# Altium PCB PCI Express_16765X6890_64PIN_Low profile_Clear.PCBDOC (part 7 of 9)
Units mm, origin at the board's own origin, x right, y up, seen from the top; angles counter-clockwise.
Board outline 80.71 x 137.84 mm, 6 copper layers (Top Layer, Layer 2 (GND), Layer 3, Layer 4, Layer 5 (AGND), Bottom Layer), stack 1.571 mm thick; 507 components, 297 nets, 1544 pads, 616 vias.
Unrouted connection lines stored in the file: 101.
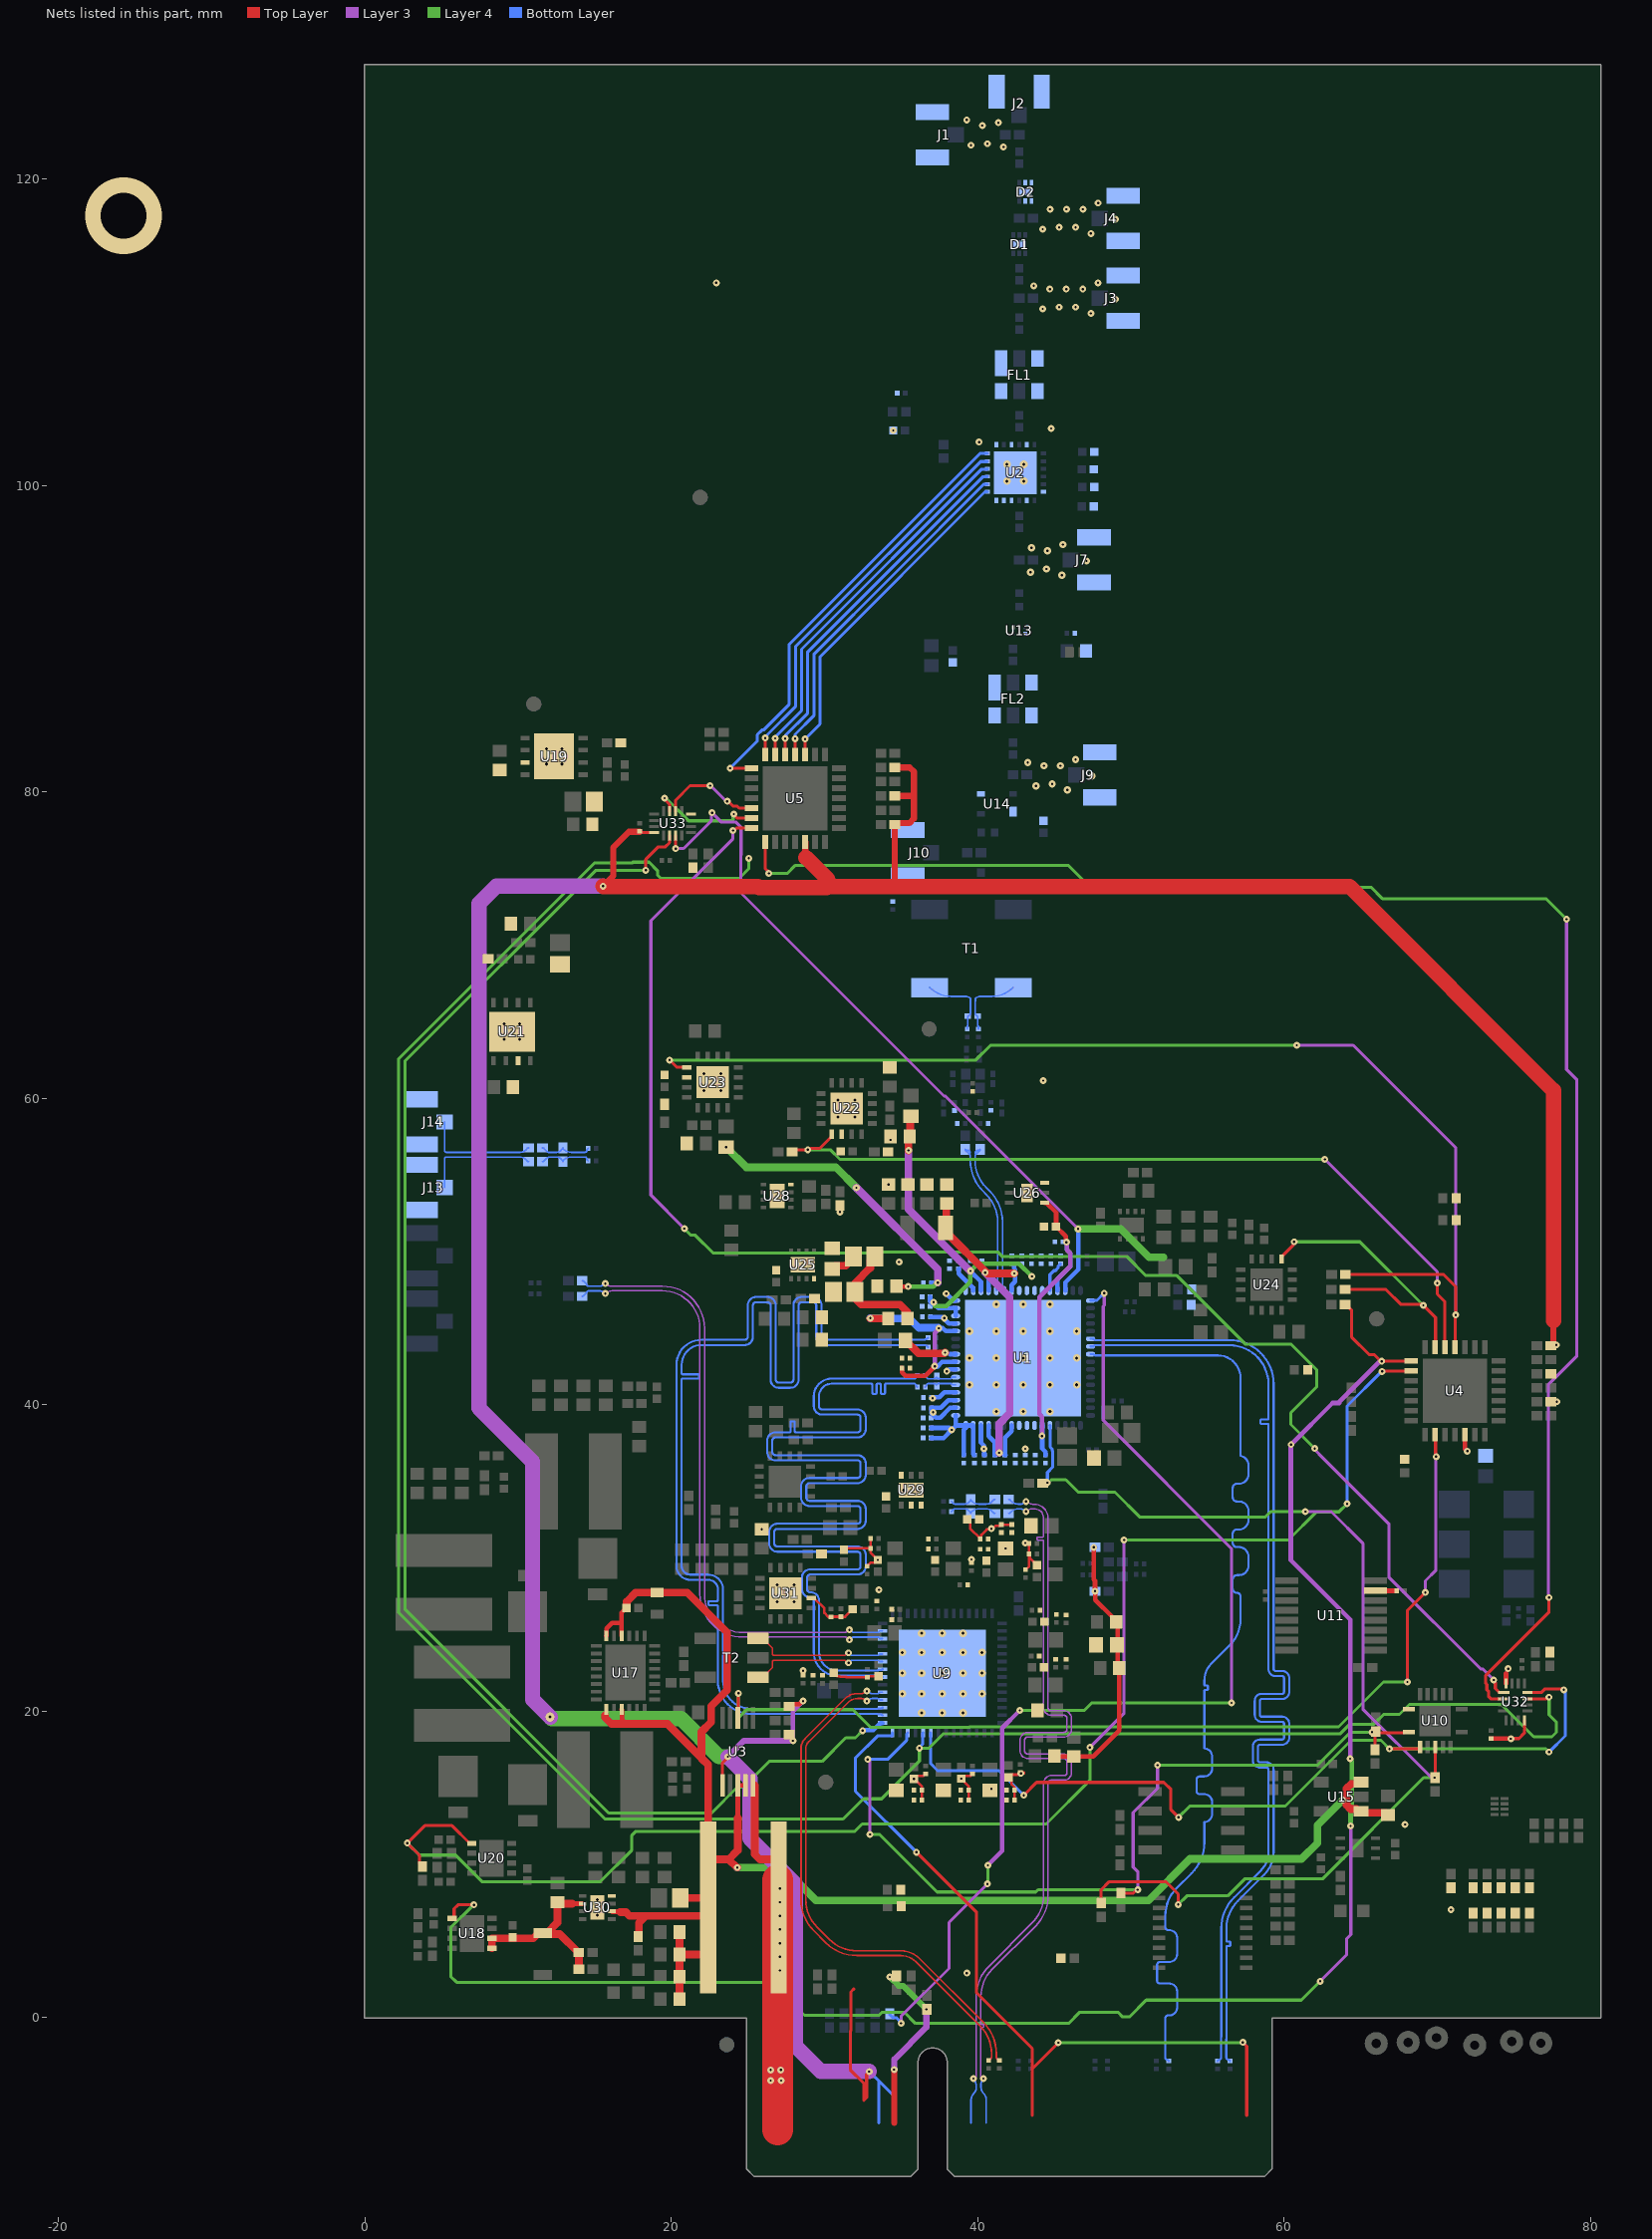
[diagram p5: the nets of this part, all layers, seen from the top]

## Via types
v1: diameter 0.45, hole 0.15, Top Layer to Bottom Layer, 469 vias
v2: diameter 0.5, hole 0.2, Top Layer to Bottom Layer, 128 vias
v3: diameter 0.475, hole 0.15, Top Layer to Bottom Layer, 15 vias
v4: diameter 5, hole 3, Top Layer to Bottom Layer, 3 vias
v5: diameter 0.6, hole 0.2, Top Layer to Bottom Layer, 1 vias

## Nets (pads, with @x,y where several pads share a name; then routed paths per layer and width w, separated by ;. In a path a pad name is that pad's centre, name@x,y a point inside that pad or via, vN(x,y) a via of type N, cw(c..) or ccw(c..) an arc to the next point about the centre after c; other vN are vias at no path point)
1.8V_SPI_ADC: C95.2 C136.2 C137.2 C244.1 R101.2 R135.2 U1.13 U1.38 U10.14 U11.15 U26.1 | length 23.9
  Top Layer w0.3: U26.1@44.369,53.169 44.494,53.169 45.119,52.543 45.119,51.618 45.768,50.97 45.768,50.625 v1(45.796,50.597) ; U11.15@65.968,27.863 65.983,27.848 67.355,27.848 C244.1@67.355,27.838
  Layer 3 w0.3: v1(44.196,37.948) 44.196,39.21 44.044,39.362 44.044,47.015 46.05,49.022 46.05,49.886 45.822,50.114 45.822,50.571 v1(45.796,50.597)
  Bottom Layer w0.3: U1.38@44.213,38.642 44.213,37.118 44.415,36.916 44.415,36.703 C137.2@44.425,36.703 ; U1.13@45.213,47.442 45.213,48.179 46.05,49.017 46.05,49.876 45.825,50.102 45.825,50.568 v1(45.796,50.597)
3.3V: C239.2 C241.2 R16.2 R17.1 R18.1 R28.1 R29.1 R31.1 R32.1 R34.1 R35.1 R111.1 R112.1 R113.2 R114.2 R115.2 R123.2 R124.2 R125.2 R127.2 R128.2 U3.6 U4.5 U5.5 U32.8 U32.16 U33.8 U33.16 | length 241.1
  Top Layer w0.2: C241.2@17.932,77.413 17.942,77.413 18.028,77.327 U33.8@18.884,77.327 ; U3.6@23.345,15.148 23.345,16.628 23.698,16.981 v1(23.698,17.018) ; U5.5@28.734,76.728 28.734,75.609 28.834,75.509 ; 31.928,1.872 31.728,1.672 31.728,-0.872 31.682,-0.918 31.682,-3.412 32.559,-4.289 32.559,-5.41 32.749,-5.22 32.749,-3.708 32.918,-3.539 v1(32.918,-3.531) ; v1(74.803,18.186) 74.82,18.203 75.328,18.203 75.682,18.558 U32.8@75.682,19.399
  Top Layer w0.3: R112.1@27.686,18.466 27.736,18.466 27.886,18.316 27.886,18.266 27.911,18.24 27.911,18.088 v1(27.94,18.059) ; R111.1@27.686,20.295 27.836,20.445 28.354,20.445 28.56,20.65 v1(28.6,20.65) ; v1@71.795,37.094 U4.5@71.795,38.044 ; C239.2@73.508,18.206 74.784,18.206 v1(74.803,18.186) ; U32.16@74.482,21.799 74.482,22.474
  Top Layer w0.4: v1(15.545,73.838) 16.205,74.498 16.205,76.352 17.236,77.383 C241.2@17.932,77.383 ; U5.5@28.734,76.728 28.749,76.713 28.749,75.738 28.784,75.703 ; 34.437,73.816 34.588,73.967 R123.2@34.588,77.851 34.688,77.951 35.533,77.951 35.839,78.257 35.839,79.731 ; R125.2@34.588,79.731 35.839,79.731 ; R124.2@34.588,81.585 35.56,81.585 35.839,81.305 35.839,79.731 ; R114.2@77.405,43.84 77.455,43.84 77.555,43.94 77.555,43.99 77.582,44.018 77.582,45.466
  Top Layer w1: v1(15.545,73.838) 15.567,73.816 25.649,73.816 25.714,73.751 30.154,73.751 30.219,73.816 ; 28.784,75.703 30.219,74.268 30.219,73.816 ; 77.582,45.466 77.582,60.505 64.271,73.816 34.437,73.816 30.219,73.816
  Layer 3 w0.3: v1(27.94,18.059) 27.94,19.99 v1(28.6,20.65)
  Layer 3 w0.4: v1(23.698,17.018) 24.74,18.059 v1(27.94,18.059)
  Layer 3 w1: v5(12.09,19.609) 10.947,20.752 10.947,36.271 7.443,39.776 7.443,72.696 8.585,73.838 v1(15.545,73.838) ; v1(23.698,17.018) 25.131,15.585 25.131,11.69 28.116,8.706 28.116,-1.877 29.769,-3.531 v1(32.918,-3.531)
  Layer 4 w1: v5@12.192,19.507 20.625,19.507 23.114,17.018 v1(23.698,17.018)
  Bottom Layer w0.2: v1(32.918,-3.531) 33.29,-3.902 33.322,-3.902 34.559,-5.138 34.559,-6.888 ; 33.559,-6.888 33.559,-4.171
  other v1: 70.891,7.036 67.894,12.598 74.625,22.758 71.958,36.957 77.8,40.183 77.775,43.891
3.3Vaux: R23.2 R24.2 | length 12
  Top Layer w0.2: v1(34.265,2.642) 34.627,2.642 R24.2@34.696,2.711
  Top Layer w0.4: v1(34.544,-3.404) 34.551,-3.411 34.551,-6.881 34.559,-6.888
  Layer 3 w0.4: v1(34.544,-3.404) 34.554,-3.394 34.554,-2.734 36.652,-0.635 v1(36.652,0.533)
  Layer 4 w0.4: v1(34.265,2.642) 34.848,2.058 35.127,2.058 v1(36.652,0.533)
5V: C59.2 C148.2 L9.2 R83.2 R133.2 U18.1 U18.2 U30.6 | length 12.3
  Top Layer w0.3: 13.53,7.425 U30.6@14.214,7.425
  Top Layer w0.5: U18.1@8.301,4.504 U18.2@8.301,5.154 8.306,5.159 9.473,5.159 9.478,5.165 10.994,5.165 11.344,5.515 L9.2@11.619,5.515 ; 13.53,7.425 12.666,7.425 C148.2@12.573,7.518 12.573,6.194 11.894,5.515 L9.2@11.619,5.515 ; R133.2@13.977,3.15 13.968,3.159 13.968,4.232 R83.2@13.958,4.242 13.908,4.242 12.71,5.44 11.694,5.44 L9.2@11.619,5.515
12V: C33.2 C40.1 C41.1 C42.1 C43.1 C49.2 C149.2 L4.1 R15.2 R100.2 U3.8 U3.9 U15.1 U15.3 U17.9 U17.11 U17.26 U17.28 U30.2 | length 117.5
  Top Layer w0.3: U17.28@15.76,24.905 15.785,24.93 15.785,25.4 16.131,25.747 16.76,25.747 ; U30.2@16.114,6.925 16.139,6.9 16.651,6.9 16.673,6.878 ; U17.11@16.76,20.105 16.785,20.08 16.785,19.446 17.072,19.159 ; U17.26@16.76,24.905 16.76,25.747 ; C49.2@17.072,26.72 17.067,26.72 16.76,26.413 16.76,25.747 ; R15.2@22.708,8.28 R15.2@22.708,10.312 ; 24.345,13.014 U3.8@24.345,15.148 U3.9@24.845,15.148
  Top Layer w0.5: 15.685,19.71 15.685,19.569 16.095,19.159 17.072,19.159 19.756,19.159 21.971,16.944 ; 16.673,6.878 16.681,6.87 17.037,6.87 17.278,6.629 18.339,6.629 ; C49.2@17.072,26.72 17.077,26.72 17.097,26.74 17.097,27.147 17.675,27.725 L4.1@19.067,27.725 21.043,27.725 23.647,25.121 23.647,21.361 22.608,20.321 22.608,19.277 21.971,18.64 21.971,16.944 ; R100.2@17.831,5.276 17.881,5.326 17.881,6.171 18.339,6.629 ; C40.1@20.539,1.201 C41.1@20.539,2.658 C42.1@20.539,4.111 ; C43.1@20.539,5.573 C42.1@20.539,4.111 ; C149.2@20.588,7.798 22.131,7.798 R15.2@22.406,8.073 ; 22.406,16.509 21.971,16.944 ; R15.2@22.708,10.312 23.751,10.312 ; v1(24.308,9.779) 24.285,9.779 23.751,10.312 ; 24.345,13.014 24.345,10.906 23.751,10.312 ; U15.3@65.024,15.354 64.924,15.254 64.387,15.254 64.074,14.94 64.074,13.867 64.337,13.604 64.724,13.604 64.874,13.454 U15.1@65.024,13.454 65.124,13.354 66.641,13.354 C33.2@66.777,13.218 ; 18.339,6.629 22.131,6.629 R15.2@22.406,6.904 ; C42.1@20.539,4.111 22.131,4.111 22.406,4.386 R15.2@22.406,6.904 ; 21.971,16.944 21.971,16.916 22.406,16.482 R15.2@22.406,8.073 ; R15.2@22.406,6.904 R15.2@22.406,7.182 R15.2@22.406,8.073
  Layer 4 w0.5: v1(24.308,9.779) 27.305,9.779 29.447,7.637 51.147,7.637 53.859,10.349 61.138,10.349 62.174,11.385 62.174,12.543 v1(63.83,14.199)
04610_CS: R25.1 R144.1 R146.2 U9.12 U10.1 | length 56.1
  Top Layer w0.2: R144.1@49.341,8.119 50.165,8.119 50.377,8.331 v1(50.444,8.331) ; R146.2@65.938,17.475 65.938,18.6 R25.1@65.989,18.651 66.064,18.576 67.828,18.576 67.882,18.629 U10.1@68.142,18.629
  Layer 3 w0.2: v1(32.817,16.84) 32.969,16.688 v1(32.969,11.938) ; v1(50.444,8.331) 50.444,9.519 50.148,9.816 50.148,13.369 51.74,14.961 v1(51.74,16.459)
  Layer 4 w0.2: v1(32.969,11.938) 33.604,11.938 37.355,8.187 43.794,8.187 43.938,8.331 v1(50.444,8.331) ; v1(51.74,16.459) 62.179,16.459 64.338,18.618 v1(65.735,18.618) v1@65.689,18.572
  Bottom Layer w0.2: v1(32.817,16.84) 34.115,16.84 35.357,18.082 35.357,18.492 U9.12@35.437,18.572
4610_FINE_V: C150.2 C151.2 C154.2 C155.2 C166.2 C167.2 C169.2 C195.2 C196.2 C207.2 C208.2 FB15.1 FB16.1 FB19.1 FB23.1 FB26.1 U29.5 U29.6
  other v1: 40.894,14.91 41.823,30.603
04610_RESET: U9.15 U33.10 | length 98.9
  Top Layer w0.2: v1(18.339,74.879) 18.339,75.594 19.151,76.406 19.612,76.406 19.884,76.678 U33.10@19.884,77.127
  Layer 4 w0.2: v1(18.339,74.879) 18.313,74.854 15.056,74.854 2.61,62.407 2.61,26.651 15.913,13.348 22.631,13.348 24.314,15.03 24.708,15.03 26.391,16.713 29.851,16.713 31.392,18.254 32.021,18.254 v1(32.487,18.72)
  Bottom Layer w0.3: v1(32.487,18.72) 32.512,18.745 33.19,18.745 33.667,19.222 U9.15@33.787,19.222
04610_RESET_3.3: U5.27 U33.3 | length 7.8
  Top Layer w0.2: v1(19.558,79.578) 19.558,79.511 19.884,79.184 U33.3@19.884,78.727 ; v1(24.079,78.537) 24.079,78.492 24.294,78.278 U5.27@25.234,78.278
  Layer 4 w0.2: v1(19.558,79.578) 19.659,79.578 21.137,78.1 23.962,78.1 24.031,78.169 24.031,78.489 v1(24.079,78.537)
04610_STATUS0: U9.9 U10.2 U32.12 | length 56.8
  Top Layer w0.2: v1(43.002,14.503) 43.843,15.344 52.151,15.344 52.607,14.888 52.607,13.56 v1(53.111,13.056) ; v1(66.878,17.526) 68.827,17.526 68.867,17.566 U10.2@68.867,17.654 ; U32.12@75.932,21.199 76.777,21.199 77.006,21.429 78.215,21.429 v1(78.257,21.387)
  Layer 4 w0.2: v1(53.111,13.056) 53.848,13.792 60.078,13.792 64.37,18.085 66.319,18.085 v1(66.878,17.526) 77.089,17.526 v1(77.292,17.323)
  Bottom Layer w0.2: U9.9@36.937,18.572 36.937,16.556 37.381,16.112 41.394,16.112 v1(43.002,14.503) ; v1(77.292,17.323) 78.351,18.381 78.351,21.294 v1(78.257,21.387)
04610_STATUS0_3.3: U5.28 U32.1 | length 103.3
  Top Layer w0.2: v1(24.028,77.47) 24.096,77.47 24.254,77.628 U5.28@25.234,77.628 ; v1(73.685,22.022) 73.685,21.954 73.787,21.853 73.787,21.47 74.057,21.199 U32.1@74.332,21.199
  Layer 3 w0.2: v1(20.853,51.486) 18.669,53.67 18.669,71.577 24.028,76.937 v1(24.028,77.47) ; v1(62.001,37.135) 62.001,37.067 62.281,36.788 62.281,36.779 66.836,32.224 66.836,28.739 72.825,22.75 72.957,22.75 v1(73.685,22.022)
  Layer 4 w0.2: v1(20.853,51.486) 21.285,51.054 21.565,51.054 22.725,49.894 33.102,49.894 33.177,49.969 41.3,49.969 41.596,49.674 49.722,49.674 50.975,48.421 53.001,48.421 57.489,43.934 60.466,43.934 62.128,42.271 62.128,41.154 60.435,39.46 60.435,38.701 v1(62.001,37.135)
04610_STATUS1: U9.10 U32.11 | length 156.6
  Top Layer w0.2: U32.11@75.882,20.799 77.12,20.799 77.225,20.904 v1(77.292,20.904)
  Layer 4 w0.2: v1(25.06,75.653) 25.06,74.971 24.435,74.346 19.325,74.346 19.101,74.57 19.101,74.86 18.556,75.404 17.498,75.404 17.439,75.345 14.982,75.345 2.21,62.573 2.21,26.416 15.678,12.948 31.216,12.948 32.537,14.268 33.725,14.268 36.195,16.739 v1(36.195,17.577) 36.824,17.577 37.769,18.522 63.676,18.522 64.298,19.143 65.86,19.143 66.5,19.784 67.53,19.784 68.176,20.429 74.186,20.429 76.293,18.322 77.478,18.322 77.766,18.61 77.766,19.28 77.301,19.746 77.301,20.896 v1(77.292,20.904)
  Bottom Layer w0.2: v1(36.195,17.577) 36.195,17.644 36.417,17.866 36.417,18.552 U9.10@36.437,18.572
04610_STATUS1_3.3: U5.1 U32.2 | length 110.5
  Top Layer w0.2: U5.1@26.134,76.728 26.134,74.975 26.365,74.744 v1(26.365,74.676) ; U32.2@74.282,20.799 73.485,20.799 73.355,20.93 73.355,21.266 73.231,21.39 73.231,21.733 73.16,21.804 73.16,22.329 77.292,26.461 v1(77.292,27.407)
  Layer 3 w0.2: v1(77.292,27.407) 77.25,27.449 77.25,41.315 77.557,41.622 77.563,41.622 79.113,43.172 79.113,61.19 78.435,61.867 v1(78.435,71.679)
  Layer 4 w0.2: v1(26.365,74.676) 27.581,74.676 28.106,75.201 45.905,75.201 47.338,73.768 65.672,73.768 66.415,73.025 77.089,73.025 v1(78.435,71.679)
04610_SYNC: U9.14 | length 50.6
  Top Layer w0.2: v1(36.002,10.779) 39.929,6.852 39.929,1.6 43.559,-2.03 43.559,-3.355 ; 43.559,-6.388 43.559,-3.355 ; v1(45.263,-1.651) 43.559,-3.355 ; v1(57.302,-1.626) 57.559,-1.882 57.559,-6.388
  Layer 4 w0.2: v1(45.263,-1.651) 45.276,-1.638 57.29,-1.638 v1(57.302,-1.626)
  Bottom Layer w0.2: U9.14@34.437,18.572 34.437,18.416 34.393,18.372 33.46,18.372 32.021,16.933 32.021,14.76 v1(36.002,10.779)
9690_AGND_SR: C93.1 C96.1 C97.1 C98.1 C138.1 C139.1 C140.1 C141.1 FB11.1 R72.1 U1.56 U1.60 U25.4 U25.9 | length 15.7
  Top Layer w0.3: C138.1@35.065,42.393 35.065,42.108 35.29,41.883 36.579,41.883 v1(37.195,42.499)
  Top Layer w0.5: FB11.1@30.505,48.855 30.705,49.055 31.386,49.055 31.888,49.557 C141.1@31.888,49.657 ; v1@32.995,45.618 C93.1@34.163,45.618
  Layer 3 w0.3: v1(37.195,42.499) 37.195,44.673 37.465,44.943 v1(37.465,44.983)
  Bottom Layer w0.3: v1(37.195,42.499) 37.323,42.499 37.353,42.469 37.676,42.792 U1.56@38.563,42.792 ; v1(37.465,44.983) 37.721,44.983 37.913,44.792 U1.60@38.563,44.792
  Bottom Layer w0.5: v1(32.995,45.644) 33.02,45.618 35.553,45.618 36.163,45.009 37.44,45.009 v1(37.465,44.983)
9690_AVDD1_PG: R107.1 U4.18 U23.5 | length 78.2
  Top Layer w0.2: v1(19.888,62.484) 20.356,62.016 U23.5@21.017,62.016 ; R107.1@64.001,48.489 70.409,48.489 71.196,47.701 v1(71.196,45.847) 71.171,45.822 71.171,43.769 U4.18@71.145,43.744
  Layer 3 w0.2: v1(60.833,63.449) 64.516,63.449 71.209,56.756 71.196,56.744 v1(71.196,45.847)
  Layer 4 w0.2: v1(19.888,62.484) 39.878,62.484 40.843,63.449 v1(60.833,63.449)
9690_AVDD2_PG: R106.1 U4.19 U22.5 | length 52.7
  Top Layer w0.2: R106.1@27.882,56.49 28.023,56.631 v1(28.912,56.631) 28.99,56.708 29.674,56.708 30.464,57.499 U22.5@30.464,57.649 ; v1(70.002,47.93) 70.002,47.219 70.49,46.731 70.49,43.749 U4.19@70.495,43.744
  Layer 3 w0.2: v1(62.662,56.007) 70.002,48.666 v1(70.002,47.93)
  Layer 4 w0.2: v1(28.912,56.631) 30.38,56.631 31.004,56.007 v1(62.662,56.007)
9690_CS: R26.1 R147.1 R148.2 U1.37 U10.4 | length 73
  Top Layer w0.2: R147.1@48.057,7.595 48.057,8.331 48.59,8.865 52.273,8.865 53.086,8.052 v1(53.086,7.366) v1@53.018,7.366 ; R26.1@69.857,15.926 69.867,15.936 U10.4@69.867,17.654
  Layer 3 w0.2: v1(61.392,33.02) 63.068,33.02 65.143,30.946 65.143,20.119 69.616,15.646 v1(69.825,15.646)
  Layer 4 w0.2: v1(44.552,34.9) 44.619,34.9 44.814,35.094 45.748,35.094 46.563,34.279 48.962,34.279 50.594,32.647 58.752,32.647 59.124,33.02 v1(61.392,33.02) ; v1(53.086,7.366) 53.651,7.931 56.318,7.931 57.429,9.042 62.509,9.042 69.113,15.646 v1(69.825,15.646)
  Bottom Layer w0.2: v1(44.552,34.9) 44.552,35.576 44.885,35.909 44.885,36.977 44.865,36.997 44.865,37.103 44.732,37.235 44.732,38.622 U1.37@44.713,38.642
9690_DVDD1_PG: R108.1 U4.20 U24.5 | length 20.2
  Top Layer w0.2: U24.5@59.827,49.503 59.827,49.653 60.607,50.434 60.607,50.574 v1(60.655,50.622) ; R108.1@63.983,47.523 66.642,47.523 67.633,46.533 69.037,46.533 69.886,45.684 69.886,43.784 U4.20@69.845,43.744
  Layer 4 w0.2: v1(60.655,50.622) 64.948,50.622 v1(69.088,46.482)
9690_FAST_DETECT: R22.2 U1.17 | length 70
  Layer 3 w0.2: v1(35.001,-0.381) 35.001,0.076 38.127,3.202 38.127,6.199 v1(40.64,8.712) ; v1(48.26,47.269) 48.26,46.475 48.192,46.407 48.192,38.972 56.566,30.598 v1(56.566,20.523)
  Layer 3 w0.3: v1(40.665,9.931) 41.605,10.871 41.605,18.898 v1(42.748,20.041)
  Layer 4 w0.2: v1(40.64,8.712) 40.665,8.738 v1(40.665,9.931) ; v1(42.748,20.041) 46.965,20.041 47.447,20.523 v1(56.566,20.523)
  Bottom Layer w0.2: R22.2@34.265,0.24 34.265,0.19 34.465,-0.01 34.689,-0.01 35.001,-0.323 v1(35.001,-0.381) ; U1.17@47.363,46.792 47.373,46.802 47.793,46.802 v1(48.26,47.269)
9690_PDWN: U1.14 U33.11 | length 52.8
  Top Layer w0.2: v1(20.284,76.287) U33.11@20.284,77.127
  Layer 3 w0.2: v1(20.284,76.287) 20.295,76.298 20.809,76.298 22.617,78.106 22.617,78.51 22.698,78.59 22.7,78.59 23.278,78.012 24.229,78.012 24.553,77.687 24.553,75.889 24.535,75.871 24.535,73.402 37.806,60.13 37.888,60.13 v1(46.558,51.46)
  Layer 3 w0.3: v1@22.683,78.607 v1@22.698,78.622
  Layer 4 w0.5: v1(46.558,51.46) 49.337,51.46 51.177,49.621 52.132,49.621
  Bottom Layer w0.3: U1.14@45.713,47.442 45.713,47.972 46.56,48.819 46.56,51.458 v1(46.558,51.46)
  other v1: 22.665,78.625
9690_PDWN_3.3: U5.26 U33.2 | length 6.7
  Top Layer w0.2: U33.2@20.284,78.727 20.284,79.451 21.224,80.391 v1(22.53,80.391) ; v1(23.647,79.375) 23.715,79.375 24.028,79.062 24.297,79.062 24.431,78.928 U5.26@25.234,78.928
  Layer 3 w0.2: v1(22.53,80.391) 22.581,80.391 23.597,79.375 v1(23.647,79.375)
9690_V_1P0: C229.2 U1.12 | length 2.2
  Bottom Layer w0.2: U1.12@44.732,47.461 U1.12@44.713,47.442 44.713,48.484 44.965,48.736 45.064,48.736 45.24,48.912 45.24,49.011 C229.2@45.415,49.186 45.405,49.186 C229.2@45.355,49.136
+12V: R15.1 U3.10 | length 25.5
  Top Layer w0.5: U3.10@25.445,15.148 25.445,10.66 25.793,10.312 26.731,10.312 27.006,10.037 R15.1@27.006,7.182
  Top Layer w2: 26.949,-7.341 26.949,3.06 26.949,5.74 R15.1@26.949,8.992
  other v1: 26.492,-4.115 27.178,-4.115 26.492,-3.429 27.153,-3.429 27.085,3.06 27.085,3.953 27.085,4.846 27.085,5.74 27.085,6.633 27.085,7.526 27.085,8.419
ADC1_3.3_PG: R103.2 U4.22 U18.5 | length 119.7
  Top Layer w0.2: U18.5@5.701,6.454 5.826,6.454 5.826,7.098 6.078,7.351 v1(7.119,7.351) ; R103.2@63.983,46.533 64.033,46.533 64.398,46.168 64.398,44.416 65.557,43.256 65.888,43.256 66.319,42.824 v1(66.37,42.824) 66.38,42.834 68.286,42.834 U4.22@68.295,42.844
  Layer 3 w0.2: v1(62.357,2.362) 64.067,4.072 64.067,5.12 64.355,5.408 64.355,12.48 v1(64.338,12.497) ; v1@66.314,42.824 v1(66.37,42.824)
  Layer 3 w0.3: v1(64.313,16.891) 64.313,25.959 60.436,29.836 60.436,37.373 v1(60.452,37.389) 63.17,40.107 63.596,40.107 63.596,40.177 66.214,42.796 66.301,42.796 66.314,42.808 v1@66.314,42.824
  Layer 4 w0.2: v1(7.119,7.351) 7.095,7.351 5.603,5.859 5.603,2.681 5.992,2.292 26.545,2.292 28.701,0.135 33.568,0.135 33.773,0.341 35.207,0.341 35.939,-0.392 45.936,-0.392 46.668,0.341 49.158,0.341 49.465,0.034 49.9,0.034 50.996,1.13 61.125,1.13 v1(62.357,2.362)
  Layer 4 w0.3: v1(64.313,16.891) 64.313,16.85 64.43,16.733 64.43,13.538 64.338,13.446 v1(64.338,12.497)
ADC2_3.3_PG: R110.2 U4.23 U20.5 | length 99.7
  Top Layer w0.2: R110.2@3.759,9.848 3.559,10.048 3.559,10.589 v1(2.769,11.379) 3.912,12.522 5.689,12.522 6.849,11.362 U20.5@6.974,11.362 ; v1(66.396,42.164) 66.411,42.179 68.28,42.179 U4.23@68.295,42.194
  Layer 3 w0.2: v1(47.32,17.628) 49.555,19.863 v1(49.555,31.166)
  Layer 4 w0.2: v1(2.769,11.379) 3.556,10.592 5.92,10.592 7.647,8.865 15.367,8.865 17.424,10.922 17.424,11.887 17.685,12.148 31.982,12.148 32.46,12.625 32.461,12.624 44.475,12.624 47.32,15.469 v1(47.32,17.628) ; v1(49.555,31.166) 60.28,31.166 62.115,33.001 63.582,33.001 v1(64.11,33.528)
  Bottom Layer w0.2: v1(64.11,33.528) 64.11,39.909 66.364,42.164 v1(66.396,42.164)
ADC_CLK9690_N: C189.2 R14.2 U1.54 | length 2.2
  Bottom Layer w0.112: C189.2@36.576,41.91 36.647,41.839 cw(c36.591,41.784) 36.67,41.784 ccw(c36.748,41.784) 36.693,41.728 ccw(c36.796,41.832) 36.796,41.685 37.153,41.685 37.158,41.69 ccw(c37.158,41.837) 37.262,41.733 37.306,41.777 37.393,41.69 37.518,41.69 37.523,41.685 38.256,41.685 38.362,41.792 U1.54@38.563,41.792 U1.54@38.543,41.772
ADC_CLK9690_P: C188.2 R14.1 U1.53 | length 2.2
  Bottom Layer w0.112: C188.2@36.576,41.148 36.647,41.219 ccw(c36.591,41.274) 36.67,41.274 cw(c36.748,41.274) 36.693,41.33 cw(c36.796,41.226) 36.796,41.373 37.153,41.373 37.158,41.368 cw(c37.158,41.221) 37.262,41.325 37.306,41.281 37.393,41.368 37.518,41.368 37.523,41.373 38.281,41.373 38.362,41.292 U1.53@38.563,41.292
AGND: C1.2 C2.2 C4.1 C7.1 C8.1 C9.1 C10.1 C11.2 C12.2 C13.2 C14.2 C20.1 C26.1 C27.1 C30.1 C31.1 C67.1 C68.1 C71.1 C73.1 C74.1 C75.1 C77.1 C78.1 C79.1 C82.1 C83.1 C84.1 C95.1 C99.1 C100.1 C101.1 C102.1 C103.1 C104.1 C105.1 C106.1 C107.1 C108.1 C109.1 C110.1 C111.1 C113.1 C114.1 C115.1 C116.1 C117.1 C118.1 C119.1 C120.1 C121.1 C122.1 C123.1 C124.1 C125.1 C136.1 C137.1 C143.1 C144.1 C145.1 C146.1 C150.1 C151.1 C152.1 C153.1 C154.1 C155.1 C156.1 C157.1 C158.1 C159.1 C160.1 C161.1 C162.1 C163.1 C164.1 C165.1 C166.1 C167.1 C169.1 C170.1 C174.1 C180.1 C181.1 C182.1 C184.1 C190.1 C191.1 C192.1 C193.1 C194.1 C195.1 C196.1 C197.1 C198.1 C199.1 C200.1 C201.1 C202.1 C203.1 C204.1 C205.1 C206.1 C207.1 C208.1 C211.1 C212.1 C213.1 C214.1 C215.1 C216.1 C217.1 C218.1 C219.1 C220.1 C221.2 C229.1 D1.7 D2.2 D2.3 D2.4 D2.5 D2.7 FB5.2 FB6.2 FB7.2 FB8.2 FB9.2 FB11.2 FB21.1 FB29.2 FB31.2 FB32.2 FB33.2 FB34.2 FB36.2 FL1.1 FL1.3 FL1.4 FL1.6 FL2.1 FL2.3 FL2.4 FL2.6 J1.1 J1.3 J2.1 J2.3 J3.1 J3.3 J4.1 J4.3 J7.1 J7.3 J9.1 J9.3 J10.1 J10.3 J13.1 J13.3 J14.1 J14.3 R62.1 R64.1 R66.1 R68.1 R76.1 R88.1 U1.65 U2.1 U2.3 U2.5 U2.12 U2.14 U2.16 U2.17 U2.18 U2.25 U9.57 U13.1 U13.4 U14.2 U14.4 U19.3 U19.9 U21.3 U21.9 U22.6 U22.17 U23.6 U23.17 U26.3 U26.7 U28.4 U28.9 U29.3 U29.7 U30.4 U30.9 U31.6 U31.17 | length 26.5
  Top Layer w0.165: U31.6@29.132,27.361 29.332,27.361 29.987,26.706 29.987,26.403 30.24,26.15 C211.1@30.429,26.15 ; C190.1@30.607,22.497 30.607,22.492 30.825,22.274 30.994,22.274 31.029,22.239 31.393,22.239 31.419,22.213 C201.1@32.791,22.213 32.854,22.276 C202.1@33.528,22.276 ; C212.1@31.064,26.156 31.061,26.153 30.432,26.153 C211.1@30.429,26.15 ; C221.2@31.267,30.54 31.35,30.622 C158.1@33.016,30.622 ; C214.1@31.843,26.645 31.838,26.645 31.343,26.15 31.061,26.15 C211.1@30.429,26.15 ; C160.1@32.782,29.464 32.792,29.464 32.998,29.67 33.288,29.67 33.475,29.857 v1(33.475,29.862) 33.475,29.867 33.016,30.327 C158.1@33.016,30.622 ; C159.1@33.016,31.259 C158.1@33.016,30.622 ; C150.1@36.362,14.178 C151.1@36.362,14.828 36.362,15.051 35.842,15.571 v1(35.842,15.576) 35.842,15.581 36.03,15.769 36.455,15.769 36.592,15.906 C152.1@36.602,15.906 ; C169.1@39.31,32.512 39.315,32.512 39.503,32.324 39.503,31.916 40.171,31.247 C155.1@40.171,31.237 40.239,31.305 40.239,31.494 40.592,31.848 40.839,31.848 v1(40.894,31.902) 40.971,31.902 41.17,32.101 41.487,32.101 C207.1@41.554,32.168 C208.1@42.215,32.168 ; C166.1@39.411,14.178 39.411,15.089 38.919,15.582 v1(38.919,15.587) 38.919,15.592 39.107,15.779 39.529,15.779 39.656,15.906 C174.1@39.666,15.906 ; C195.1@42.414,14.178 C196.1@42.414,14.828 42.414,15.017 42.199,15.232 42.199,15.466 C198.1@42.012,15.654 42.012,15.659 42.199,15.846 42.62,15.846 42.764,15.99 C197.1@42.774,15.99 43.016,15.99 43.016,15.932 43.01,15.926 v1(42.824,15.926) ; C164.1@43.121,29.228 43.131,29.228 43.354,29.452 C162.1@43.354,30.262 ; C163.1@43.354,30.937 C162.1@43.354,30.262 ; C165.1@43.874,29.512 43.874,29.517 43.422,29.969 43.422,30.195 C162.1@43.354,30.262
  other v1: 39.294,2.896 28.6,22.631 33.553,27.915 39.599,29.896 43.104,30.963 25.908,31.867 34.872,49.308 31.014,52.569 34.176,54.371 34.312,57.274 44.272,61.138 40.093,102.819 34.487,103.581 44.792,103.708 47.386,111.226 44.244,111.516 45.313,111.626 46.388,111.626 48.992,112.15 44.709,112.807 45.784,112.807 46.859,112.807 43.655,113.018 22.934,113.218 47.853,113.218 47.386,116.433 44.245,116.718 45.313,116.833 46.388,116.833 48.992,117.357 44.719,118.014 45.794,118.014 46.869,118.014 47.863,118.425 41.683,122.083 39.558,122.194 40.629,122.294 40.295,123.475 41.354,123.665 39.287,123.848
  other v2: 15.164,6.675 15.164,7.675 36.337,19.872 37.687,19.872 39.037,19.872 35.087,21.122 36.337,21.122 37.687,21.122 39.037,21.122 40.287,21.122 35.087,22.472 36.337,22.472 37.687,22.472 39.037,22.472 40.287,22.472 35.087,23.822 36.337,23.822 37.687,23.822 39.037,23.822 40.287,23.822 36.337,25.072 37.687,25.072 39.037,25.072 26.907,27.136 28.007,27.136 26.907,28.236 28.007,28.236 35.162,34.417 36.162,34.417 41.213,39.542 42.963,39.542 44.713,39.542 39.463,41.292 41.213,41.292 42.963,41.292 44.713,41.292 46.463,41.292 39.463,43.042 41.213,43.042 42.963,43.042 44.713,43.042 46.463,43.042 39.463,44.792 41.213,44.792 42.963,44.792 44.713,44.792 46.463,44.792 41.213,46.542 42.963,46.542 44.713,46.542 30.889,58.774 31.989,58.774 30.889,59.874 31.989,59.874 22.142,60.491 23.242,60.491 22.142,61.591 23.242,61.591 9.101,63.838 10.101,63.838 9.101,64.838 10.101,64.838 11.851,81.811 12.851,81.811 11.851,82.811 12.851,82.811 41.909,100.274 43.009,100.274 41.909,101.374 43.009,101.374
  other v3: 45.862,80.111 43.799,80.37 44.864,80.511 47.468,81.035 44.327,81.692 45.402,81.692 43.273,81.903 46.396,82.103 45.494,94.136 43.442,94.325 44.496,94.536 47.1,95.06 44.56,95.717 43.506,95.928 45.553,96.128
  other v4: -15.748,117.602
Alert: U3.3 U4.2 | length 65.8
  Top Layer w0.2: U3.3@24.345,19.548 24.365,19.567 24.365,21.139 v1(24.384,21.158) ; v1(68.047,21.895) 68.047,26.568 v1(69.215,27.737) ; U4.2@69.845,38.044 69.886,38.004 69.886,36.642 v1(69.926,36.601)
  Layer 3 w0.2: v1(68.047,21.895) v1@68.072,21.895 ; v1(69.215,27.737) 69.215,28.499 69.909,29.193 69.909,36.584 v1(69.926,36.601)
  Layer 4 w0.2: v1(24.384,21.158) 24.384,19.558 24.917,20.091 31.857,20.091 33.027,18.922 39.43,18.922 39.48,18.972 63.561,18.972 66.483,21.895 v1(68.047,21.895)
AN_IN_9690_N: R4.2 U1.5 | length 10.3
  Bottom Layer w0.112: 39.519,56.41 ccw(c39.328,56.41) 39.328,56.6 cw(c39.328,56.792) R4.2@39.192,56.656 ccw(c39.313,56.656) 39.228,56.571 39.436,56.363 cw(c39.436,56.326) 39.462,56.352 cw(c39.329,56.219) 39.517,56.219 39.517,55.938 ccw(c42.367,55.938) 40.352,53.923 40.563,53.712 cw(c38.767,51.916) 41.307,51.916 41.307,47.802 cw(c41.147,47.802) 41.26,47.689 ccw(c41.373,47.576) 41.213,47.576 U1.5@41.213,47.442
AN_IN_9690_P: R13.2 U1.6 | length 10.3
  Bottom Layer w0.112: 39.831,56.402 cw(c40.022,56.402) 40.022,56.593 ccw(c40.022,56.785) R13.2@40.157,56.649 cw(c40.037,56.649) 40.122,56.564 39.914,56.355 ccw(c39.914,56.311) 39.883,56.343 ccw(c40.011,56.215) 39.83,56.215 39.83,55.939 ccw(c42.37,55.939) 40.573,54.143 40.784,53.932 cw(c38.77,51.917) 41.619,51.917 41.619,47.802 ccw(c41.779,47.802) 41.666,47.689 cw(c41.553,47.576) 41.713,47.576 U1.6@41.713,47.442
AN_IN_N: C3.1 R7.2 T1.3 | length 5
  Bottom Layer w0.112: T1.3@36.867,67.222 ccw(c38.264,68.619) 38.264,66.643 39.201,66.643 cw(c39.201,66.164) 39.54,66.503 cw(c39.484,66.503) 39.524,66.463 39.524,65.539 39.519,65.534 39.519,65.503 cw(c39.445,65.503) 39.497,65.451 39.432,65.386 cw(c39.355,65.463) R7.2@39.355,65.354 39.355,64.745 cw(c39.319,64.745) 39.319,64.709 C3.1@39.319,64.503
AN_IN_P: C6.1 R7.1 T1.2 | length 4.8
  Bottom Layer w0.112: C6.1@40.056,64.503 40.056,64.658 ccw(c40.005,64.658) 40.005,64.709 R7.1@40.005,65.354 cw(c40.005,65.463) 39.928,65.386 39.863,65.451 cw(c39.915,65.503) 39.841,65.503 39.841,65.534 39.836,65.539 39.836,66.292 cw(c39.892,66.292) 39.853,66.331 39.853,66.503 cw(c40.191,66.164) 40.191,66.643 40.92,66.643 ccw(c40.92,68.619) T1.2@42.317,67.222
ATT_V1: U2.19 U5.17 | length 22.2
  Top Layer w0.2: U5.17@28.734,82.428 v1(28.734,83.444)
  Bottom Layer w0.2: v1(28.734,83.444) 29.704,84.414 29.704,88.803 40.476,99.574 U2.19@40.634,99.574
ATT_V2: U2.20 U5.18 | length 23
  Top Layer w0.2: U5.18@28.084,82.428 v1(28.084,83.459)
  Bottom Layer w0.2: v1(28.084,83.459) 28.084,83.747 29.304,84.967 29.304,88.968 34.582,94.246 40.41,100.074 U2.20@40.634,100.074
ATT_V3: U2.21 U5.19 | length 23.8
  Top Layer w0.2: U5.19@27.434,82.428 v1(27.434,83.474)
  Bottom Layer w0.2: v1(27.434,83.474) 27.482,83.521 27.482,83.71 28.904,85.132 28.904,89.134 40.32,100.549 40.609,100.549 U2.21@40.634,100.574
ATT_V4: U2.22 U5.20 | length 24.6
  Top Layer w0.2: U5.20@26.784,82.428 v1(26.784,83.489)
  Bottom Layer w0.2: v1(26.784,83.489) 26.784,83.556 26.909,83.681 26.909,83.703 28.504,85.298 28.504,89.3 40.254,101.049 40.609,101.049 U2.22@40.634,101.074
ATT_V5: U2.23 U5.21 | length 25.4
  Top Layer w0.2: U5.21@26.134,82.428 v1(26.134,83.504)
  Bottom Layer w0.2: v1(26.134,83.504) 26.134,83.571 26.259,83.696 26.259,83.706 28.104,85.551 28.104,89.465 40.188,101.549 40.609,101.549 U2.23@40.634,101.574
ATT_V6: U2.24 U5.22 | length 29.2
  Top Layer w0.2: v1(23.841,81.528) U5.22@25.234,81.528
  Bottom Layer w0.2: v1(23.841,81.528) 25.609,83.296 25.609,83.721 25.917,84.029 26.016,84.029 27.704,85.717 27.704,89.631 40.147,102.074 U2.24@40.634,102.074
AVDD1_1.25V: C83.2 C113.2 C114.2 C115.2 C116.2 C117.2 C118.2 C119.2 C120.2 C121.2 FB10.2 U1.1 U1.2 U1.47 U1.48 U1.49 U1.52 U1.55 U1.61 U1.64 | length 36.9
  Top Layer w0.3: C83.2@34.696,47.727 34.722,47.701 v1(35.458,47.701)
  Layer 3 w0.5: v1(32.08,54.153) 37.389,48.844 v1(37.389,47.955)
  Layer 4 w0.3: v1(35.458,47.701) 37.094,47.701 37.348,47.955 v1(37.389,47.955) ; v1@37.393,47.96 v1(37.389,47.955) ; v1@37.417,47.927 v1(37.389,47.955)
  Layer 4 w0.5: v1(23.581,56.803) 24.893,55.491 30.742,55.491 v1(32.08,54.153)
  Bottom Layer w0.3: C116.2@36.918,45.72 37.692,45.72 38.12,45.292 U1.61@38.563,45.292 ; C121.2@36.957,37.821 37.77,37.821 v1(38.303,38.354) 38.591,38.642 ; C117.2@36.963,38.481 v1@38.136,38.481 ; C118.2@36.982,40.462 36.982,40.472 37.496,40.472 37.816,40.792 U1.52@38.563,40.792 ; C113.2@36.982,47.955 v1(37.389,47.955) ; v1(37.948,47.244) 37.96,47.244 38.413,46.792 U1.64@38.563,46.792 ; v1(37.984,42.175) 38.024,42.175 38.14,42.292 U1.55@38.563,42.292 ; U1.49@38.563,39.292 38.563,38.67 38.591,38.642 ; C115.2@38.761,48.856 38.771,48.856 38.771,48.533 39.713,47.592 U1.2@39.713,47.442 ; C120.2@39.091,36.703 39.091,38.369 39.213,38.492 U1.48@39.213,38.642 ; C119.2@39.776,36.697 39.766,36.697 39.766,36.707 39.713,36.761 U1.47@39.713,38.642 U1.48@39.213,38.642 ; 38.591,38.642 U1.48@39.213,38.642
  other v1: 37.059,40.411 37.821,45.644
AVDD1_SR_1.25V: C93.2 C138.2 C139.2 C140.2 C141.2 FB13.2 U1.57 | length 10.8
  Top Layer w0.5: C141.2@33.288,49.657 32.988,49.357 32.988,48.921 31.993,47.925 C140.2@31.993,47.371 31.993,46.909 32.383,46.518 34.915,46.518 35.413,46.021 C93.2@35.413,45.618 ; FB13.2@35.284,44.196 36.148,43.332 37.821,43.332 v1(37.871,43.383)
  Bottom Layer w0.3: 38.186,43.292 U1.57@38.563,43.292
AVDD2_2.5V: C78.2 C99.2 C100.2 C101.2 C102.2 C103.2 C104.2 C105.2 C106.2 C107.2 C108.2 C109.2 C110.2 C111.2 FB4.2 U1.3 U1.8 U1.9 U1.10 U1.11 U1.39 U1.40 U1.41 U1.46 U1.50 U1.51 U1.62 U1.63 | length 30.4
  Top Layer w0.5: v1(35.484,56.591) 35.484,57.421 C78.2@35.562,57.499 35.599,57.537 35.599,58.777 FB4.2@35.637,58.815
  Layer 3 w0.5: v1(35.484,56.591) 35.484,52.756 v1(39.522,48.717)
  Layer 4 w0.3: 37.211,46.431 37.948,46.431 39.522,48.006 v1(39.522,48.717) 39.53,48.717 40.004,49.191 42.707,49.191 v1(43.536,48.362)
  Bottom Layer w0.3: C100.2@36.893,47.041 36.893,46.711 37.02,46.584 37.058,46.546 v1@37.121,46.546 ; v1@37.14,46.589 37.437,46.292 U1.63@38.563,46.292 U1.62@38.563,45.792 ; U1.50@38.563,39.792 38.197,39.792 37.557,39.151 37.262,39.151 36.982,39.431 C99.2@36.982,39.776 36.982,39.786 37.582,39.786 38.088,40.292 U1.51@38.563,40.292 ; v1(39.522,48.717) 40.213,48.027 U1.3@40.213,47.442 ; U1.46@40.213,38.642 40.213,37.517 40.427,37.303 40.427,36.703 C111.2@40.437,36.703
  other v1: 40.411,37.109 43.104,37.109 37.084,39.497 37.121,46.685
AVDD3_3.3V: C122.2 C123.2 C124.2 C125.2 C146.2 L8.2 U1.4 U1.7 U1.42 U1.45 | length 28
  Top Layer w0.5: C146.2@37.989,53.121 37.946,53.078 37.946,51.588 L8.2@37.903,51.545 37.903,51.291 40.629,48.565 v1(42.393,48.565)
  Layer 3 w0.5: v1(40.488,48.616) 42.088,47.015 42.088,39.427 41.402,38.741 v1(41.402,36.855)
  Bottom Layer w0.3: C125.2@40.285,48.856 40.295,48.856 40.459,48.692 40.459,48.644 v1(40.488,48.616) 40.488,48.575 40.713,48.35 U1.4@40.713,47.442 ; U1.45@40.713,38.642 40.713,37.951 41.113,37.551 41.113,36.703 C123.2@41.123,36.703 ; C122.2@41.806,36.716 41.793,36.703 C122.2@41.783,36.703 41.783,37.846 42.213,38.276 U1.42@42.213,38.642 ; U1.7@42.213,47.442 42.213,47.799 42.443,48.029 42.443,48.813 42.365,48.892 42.365,49.186 C124.2@42.24,49.186
CLK_GND: C171.2 C172.2 C173.2 C222.2 FB21.2 R79.2 R84.1 | length 17.7
  Top Layer w0.3: C173.2@44.999,17.069 45.04,17.028 C172.2@46.279,17.028 47.534,17.028 49.241,18.735 C171.2@49.241,22.809 49.137,22.913 49.137,25.705 C222.2@49.034,25.808 48.784,26.058 48.784,26.153 47.685,27.253 47.685,27.792 v1(47.656,27.82) 47.656,28.495 47.574,28.577 v1(47.574,30.683)
  Bottom Layer w0.3: v1(47.574,30.683) 47.581,30.69 R84.1@47.656,30.69
CLKin0_1_N: C223.1 R87.1 R92.2 | length 3.5
  Bottom Layer w0.112: R92.2@11.593,55.855 ccw(c11.593,55.975) 11.679,55.89 11.833,56.044 cw(c12.091,55.786) 12.091,56.151 12.242,56.151 12.244,56.153 12.505,56.153 cw(c12.505,55.737) 12.799,56.032 R87.1@12.886,55.945 ; R87.1@12.886,55.945 cw(c12.801,55.86) R87.1@12.921,55.86 cw(c13.042,55.86) 12.957,55.945 cw(c13.46,55.442) 13.46,56.153 14.109,56.153 14.111,56.156 14.373,56.156 cw(c14.373,56.043) 14.453,56.123 14.454,56.122 cw(c14.377,56.044) 14.486,56.044 ccw(c14.595,56.044) 14.518,55.967 C223.1@14.58,55.905
CLKin0_1_P: C224.1 R87.2 R93.2 | length 3.5
  Bottom Layer w0.112: R93.2@11.593,56.76 cw(c11.593,56.639) 11.679,56.724 11.879,56.524 ccw(c12.026,56.671) 12.026,56.463 12.112,56.463 12.115,56.466 12.505,56.466 ccw(c12.505,56.882) 12.8,56.588 R87.2@12.886,56.674 ; R87.2@12.886,56.674 ccw(c12.801,56.76) R87.2@12.921,56.76 ccw(c13.042,56.76) 12.957,56.674 ccw(c13.46,57.177) 13.46,56.466 13.979,56.466 13.981,56.468 14.373,56.468 ccw(c14.373,56.581) 14.453,56.501 14.454,56.502 ccw(c14.377,56.579) 14.486,56.579 cw(c14.595,56.579) 14.518,56.656 C224.1@14.58,56.718
CLKin0_N: J13.2 R92.1 | length 7.5
  Bottom Layer w0.112: J13.2@5.207,54.178 5.207,56.043 cw(c5.319,56.043) 5.24,56.123 cw(c5.319,56.043) 5.319,56.156 7.792,56.156 7.796,56.151 10.138,56.151 cw(c10.138,55.645) 10.495,56.003 10.608,55.89 ccw(c10.693,55.975) R92.1@10.693,55.855
CLKin0_P: J14.2 R93.1 | length 7.5
  Bottom Layer w0.112: J14.2@5.207,58.445 5.207,56.581 ccw(c5.319,56.581) 5.24,56.501 ccw(c5.319,56.581) 5.319,56.468 7.921,56.468 7.926,56.463 10.138,56.463 ccw(c10.138,56.969) 10.495,56.611 10.608,56.724 cw(c10.693,56.639) R93.1@10.693,56.76
CLKin1_1_N: C225.1 R94.2 R95.1 | length 3.2
  Bottom Layer w0.112: C225.1@38.29,33.68 38.384,33.587 ccw(c38.418,33.587) 38.394,33.562 ccw(c38.528,33.697) 38.528,33.506 39.132,33.506 ccw(c39.132,33.923) 39.426,33.628 39.512,33.715 ccw(c39.427,33.8) R95.1@39.548,33.8 ccw(c39.669,33.8) 39.583,33.715 ccw(c40.086,34.218) 40.086,33.506 40.559,33.506 ccw(c40.559,34.02) R94.2@40.922,33.657 ; R94.2@40.922,33.657 41.037,33.772 cw(c41.123,33.687) R94.2@41.123,33.807
CLKin1_1_P: C226.1 R95.2 R96.2 | length 3.2
  Bottom Layer w0.112: C226.1@38.29,33.02 38.384,33.114 cw(c38.418,33.114) 38.394,33.138 cw(c38.528,33.004) 38.528,33.194 39.132,33.194 cw(c39.132,32.778) 39.426,33.072 39.512,32.986 cw(c39.427,32.9) R95.2@39.548,32.9 cw(c39.669,32.9) 39.583,32.986 cw(c40.086,32.482) 40.086,33.194 40.559,33.194 cw(c40.559,32.68) R96.2@40.922,33.044 ; R96.2@40.922,33.043 41.037,32.928 ccw(c41.123,33.014) R96.2@41.123,32.893
CLKin1_N: R94.1 | length 53
  Layer 3 w0.097: 40.201,0.182 40.201,0.305 ; v1(40.377,-3.988) cw(c40.377,-3.868) 40.293,-3.953 40.201,-3.861 40.201,-0.838 40.201,-0.695 cw(c40.249,-0.695) 40.249,-0.647 40.34,-0.647 ccw(c40.34,-0.598) 40.389,-0.598 40.389,-0.501 ccw(c40.34,-0.501) 40.34,-0.453 40.249,-0.453 cw(c40.249,-0.404) 40.201,-0.404 40.201,-0.356 40.201,-0.275 40.201,-0.178 40.201,0.305 ; v1(43.155,33.675) cw(c43.155,33.538) 43.252,33.635 ccw(c43.581,33.964) 43.581,33.499 43.688,33.499 cw(c43.688,32.592) 44.595,32.592 44.595,20.221 ccw(c44.799,20.221) 44.799,20.017 45.624,20.017 cw(c45.624,19.516) 46.125,19.516 46.125,18.811 cw(c45.624,18.811) 45.624,18.31 43.269,18.31 ccw(c43.269,18.106) 43.065,18.106 43.065,17.401 ccw(c43.269,17.401) 43.269,17.197 45.624,17.197 cw(c45.624,16.696) 46.125,16.696 46.125,15.991 cw(c45.624,15.991) 45.624,15.49 44.799,15.49 ccw(c44.799,15.286) 44.595,15.286 44.595,12.954 44.595,12.778 44.595,12.48 44.595,7.96 cw(c41.76,7.96) 43.764,5.955 40.944,3.135 ccw(c42.741,1.339) 40.201,1.339 40.201,0.305
  Bottom Layer w0.112: v1(40.377,-3.988) cw(c40.218,-3.988) 40.33,-4.1 40.3,-4.13 ccw(c40.523,-4.353) 40.208,-4.353 40.208,-4.483 40.215,-4.49 40.215,-4.552 ccw(c40.802,-4.552) 40.387,-4.967 cw(c39.972,-5.381) 40.559,-5.381 40.559,-6.888 ; R94.1@42.023,33.807 cw(c42.023,33.687) 42.108,33.772 42.18,33.7 ccw(c42.647,34.166) 42.647,33.506 42.801,33.506 ccw(c42.801,33.795) 43.004,33.591 43.042,33.629 cw(c43.155,33.516) v1(43.155,33.675)
CLKin1_P: R96.1 | length 53.3
  Layer 3 w0.097: v1(39.727,-3.988) ccw(c39.727,-3.868) v1@39.811,-3.953 ; v1@39.811,-3.953 39.903,-3.861 39.903,1.34 cw(c42.738,1.34) 40.734,3.345 43.554,6.165 ccw(c41.758,7.961) 44.298,7.961 44.298,11.227 44.298,12.954 ; v1(43.155,33.025) ccw(c43.155,33.163) 43.252,33.065 cw(c43.581,32.737) 43.581,33.202 43.688,33.202 cw(c43.688,32.592) 44.298,32.592 44.298,31.445 44.298,31.404 cw(c44.249,31.404) 44.249,31.356 43.925,31.356 ccw(c43.925,31.307) 43.876,31.307 43.876,31.21 ccw(c43.925,31.21) 43.925,31.161 44.249,31.161 cw(c44.249,31.113) 44.298,31.113 44.298,31.064 44.298,20.221 ccw(c44.799,20.221) 44.799,19.72 45.624,19.72 cw(c45.624,19.516) 45.828,19.516 45.828,18.811 cw(c45.624,18.811) 45.624,18.607 43.269,18.607 ccw(c43.269,18.106) 42.767,18.106 42.767,17.401 ccw(c43.269,17.401) 43.269,16.9 45.624,16.9 cw(c45.624,16.696) 45.828,16.696 45.828,15.991 cw(c45.624,15.991) 45.624,15.787 44.799,15.787 ccw(c44.799,15.286) 44.298,15.286 44.298,12.954 ; 44.298,12.48 44.298,12.778 44.298,12.954
  Bottom Layer w0.112: 39.559,-6.888 39.559,-5.45 cw(c40.31,-5.45) 39.779,-4.918 ccw(c39.48,-4.62) 39.903,-4.62 39.896,-4.613 39.896,-4.395 ccw(c39.479,-4.395) 39.774,-4.1 cw(c39.886,-3.988) v1(39.727,-3.988) ; R96.1@42.023,32.893 ccw(c42.023,33.014) 42.108,32.928 42.18,33.001 cw(c42.647,32.534) 42.647,33.194 42.801,33.194 cw(c42.801,32.906) 43.004,33.11 43.042,33.072 ccw(c43.155,33.184) v1(43.155,33.025)
CLKout1_N: C185.1 U9.16 | length 68.7
  Bottom Layer w0.138: U9.16@33.787,19.722 ccw(c33.663,19.598) 33.663,19.773 33.526,19.773 cw(c33.526,19.824) 33.49,19.788 ccw(c33.454,19.752) 33.454,19.803 29.534,19.803 29.533,19.805 25.222,19.805 cw(c25.222,21.989) 23.038,21.989 23.038,22.885 23.038,26.621 23.038,26.828 ccw(c22.969,26.828) 22.969,26.897 22.497,26.897 cw(c22.497,26.965) 22.428,26.965 22.428,27.103 cw(c22.497,27.103) 22.497,27.172 22.969,27.172 ccw(c22.969,27.24) 23.038,27.24 23.038,27.447 23.038,27.584 23.038,27.933 ccw(c22.403,27.933) 22.403,28.568 21.234,28.568 cw(c21.234,29.464) 20.338,29.464 20.338,42.596 cw(c21.967,42.596) 21.967,44.225 24.787,44.225 ccw(c24.787,44.429) 24.991,44.429 24.991,46.478 cw(c25.532,46.478) 25.532,47.019 26.278,47.019 cw(c26.278,46.478) 26.819,46.478 26.819,41.635 ccw(c27.023,41.635) 27.023,41.431 27.769,41.431 ccw(c27.769,41.635) 27.973,41.635 27.973,46.478 cw(c28.514,46.478) 28.514,47.019 29.26,47.019 cw(c29.26,46.478) 29.802,46.478 29.802,44.429 ccw(c30.006,44.429) 30.006,44.225 36.432,44.225 ccw(c36.432,44.699) 36.767,44.364 C185.1@36.767,44.374
CLKout1_P: C183.1 U9.17 | length 68.7
  Bottom Layer w0.138: U9.17@33.787,20.222 cw(c33.663,20.346) 33.663,20.171 33.526,20.171 ccw(c33.526,20.12) 33.49,20.156 cw(c33.454,20.192) 33.454,20.141 29.674,20.141 29.672,20.142 25.222,20.142 cw(c25.222,21.989) 23.375,21.989 23.375,27.933 ccw(c22.403,27.933) 22.403,28.905 21.234,28.905 cw(c21.234,29.464) 20.676,29.464 20.676,38.837 20.676,41.632 cw(c20.744,41.632) 20.744,41.701 21.747,41.701 ccw(c21.747,41.769) 21.816,41.769 21.816,41.907 ccw(c21.747,41.907) 21.747,41.976 20.744,41.976 cw(c20.744,42.044) 20.676,42.044 20.676,42.113 20.676,42.596 cw(c21.967,42.596) 21.967,43.888 24.787,43.888 ccw(c24.787,44.429) 25.328,44.429 25.328,46.478 cw(c25.532,46.478) 25.532,46.682 26.278,46.682 cw(c26.278,46.478) 26.482,46.478 26.482,41.635 ccw(c27.023,41.635) 27.023,41.094 27.769,41.094 ccw(c27.769,41.635) 28.31,41.635 28.31,46.478 cw(c28.514,46.478) 28.514,46.682 29.26,46.682 cw(c29.26,46.478) 29.464,46.478 29.464,44.429 ccw(c30.006,44.429) 30.006,43.888 36.432,43.888 cw(c36.432,43.414) 36.767,43.749 C183.1@36.767,43.739
CLKout2_N: C187.1 U9.18 | length 34.5
  Top Layer w0.112: v1(32.766,20.647) cw(c32.766,20.806) 32.654,20.694 32.616,20.731 ccw(c32.412,20.528) 32.412,20.816 32.16,20.816 ccw(c32.16,19.919) 31.526,20.553 28.958,17.985 ccw(c29.391,17.551) 28.778,17.551 28.778,7.682 ccw(c31.318,7.682) 29.522,5.885 30.313,5.095 ccw(c32.109,6.891) 32.109,4.351 34.977,4.351 cw(c34.977,2.63) 36.193,3.847 40.381,-0.34 cw(c38.366,-2.355) 41.215,-2.355 41.215,-2.588 ccw(c41.375,-2.588) 41.262,-2.701 ccw(c41.308,-2.654) 41.308,-2.72 C187.1@41.402,-2.813
  Bottom Layer w0.112: v1(32.766,20.647) ccw(c32.766,20.806) 32.878,20.694 32.916,20.731 cw(c33.12,20.528) 33.12,20.816 33.447,20.816 cw(c33.447,20.656) 33.56,20.769 ccw(c33.673,20.882) 33.673,20.722 U9.18@33.787,20.722
CLKout2_P: C186.1 U9.19 | length 35
  Top Layer w0.112: v1(32.766,21.297) ccw(c32.766,21.138) 32.654,21.25 cw(c32.359,21.545) 32.359,21.128 32.095,21.128 ccw(c32.095,20.075) 31.351,20.82 28.735,18.204 ccw(c29.386,17.554) 28.466,17.554 28.466,7.68 ccw(c31.315,7.68) 29.3,5.665 30.092,4.874 ccw(c32.108,6.889) 32.108,4.039 34.976,4.039 cw(c34.976,2.628) 35.973,3.626 40.159,-0.56 cw(c38.363,-2.356) 40.903,-2.356 40.903,-2.588 cw(c40.743,-2.588) 40.856,-2.701 cw(c40.81,-2.654) 40.81,-2.72 C186.1@40.716,-2.813
  Bottom Layer w0.112: v1(32.766,21.297) cw(c32.766,21.138) 32.878,21.25 32.916,21.213 ccw(c33.12,21.416) 33.12,21.128 33.447,21.128 ccw(c33.447,21.288) 33.56,21.175 cw(c33.673,21.062) 33.673,21.222 U9.19@33.787,21.222
CLKout3_N: C189.1 U9.21 | length 67.5
  Bottom Layer w0.138: 29.304,25.032 29.304,23.835 ccw(c30.836,23.835) 30.836,22.303 33.454,22.303 cw(c33.454,22.252) 33.49,22.288 ccw(c33.526,22.324) 33.526,22.273 33.663,22.273 cw(c33.663,22.098) U9.21@33.787,22.222 ; 29.304,25.07 29.304,27.212 ccw(c29.1,27.212) 29.1,27.416 29.068,27.416 cw(c29.068,27.957) 28.526,27.957 28.526,28.703 cw(c29.068,28.703) 29.068,29.244 32.148,29.244 ccw(c32.148,29.448) 32.352,29.448 32.352,30.194 ccw(c32.148,30.194) 32.148,30.398 26.927,30.398 cw(c26.927,30.939) 26.386,30.939 26.386,31.685 cw(c26.927,31.685) 26.927,32.227 32.148,32.227 ccw(c32.148,32.431) 32.352,32.431 32.352,33.176 ccw(c32.148,33.176) 32.148,33.38 29.018,33.38 cw(c29.018,33.922) 28.477,33.922 28.477,34.667 cw(c29.018,34.667) 29.018,35.209 32.148,35.209 ccw(c32.148,35.413) 32.352,35.413 32.352,36.158 ccw(c32.148,36.158) 32.148,36.362 26.798,36.362 cw(c26.798,36.904) 26.256,36.904 26.256,37.65 cw(c26.798,37.65) 26.798,38.191 27.026,38.191 27.717,38.191 ccw(c27.717,38.26) 27.786,38.26 27.786,38.833 cw(c27.854,38.833) 27.854,38.902 27.992,38.902 cw(c27.992,38.833) 28.061,38.833 28.061,38.26 ccw(c28.129,38.26) 28.129,38.191 28.336,38.191 28.473,38.191 32.148,38.191 ccw(c32.148,38.395) 32.352,38.395 32.352,39.141 ccw(c32.148,39.141) 32.148,39.345 29.846,39.345 cw(c29.846,39.886) 29.304,39.886 29.304,40.538 cw(c30.464,40.538) 30.464,41.698 35.894,41.698 35.975,41.778 35.975,41.829 C189.1@36.056,41.91
CLKout3_P: C188.1 U9.22 | length 67.6
  Bottom Layer w0.138: U9.22@33.787,22.722 cw(c33.663,22.846) 33.663,22.671 33.526,22.671 ccw(c33.526,22.62) 33.49,22.656 cw(c33.454,22.692) 33.454,22.641 30.836,22.641 cw(c30.836,23.835) 29.642,23.835 29.642,25.032 29.642,27.212 ccw(c29.1,27.212) 29.1,27.753 29.068,27.753 cw(c29.068,27.957) 28.864,27.957 28.864,28.703 cw(c29.068,28.703) 29.068,28.907 32.148,28.907 ccw(c32.148,29.448) 32.69,29.448 32.69,30.194 ccw(c32.148,30.194) 32.148,30.735 26.927,30.735 cw(c26.927,30.939) 26.723,30.939 26.723,31.685 cw(c26.927,31.685) 26.927,31.889 32.148,31.889 ccw(c32.148,32.431) 32.69,32.431 32.69,33.176 ccw(c32.148,33.176) 32.148,33.718 29.018,33.718 cw(c29.018,33.922) 28.814,33.922 28.814,34.667 cw(c29.018,34.667) 29.018,34.871 32.148,34.871 ccw(c32.148,35.413) 32.69,35.413 32.69,36.158 ccw(c32.148,36.158) 32.148,36.7 26.798,36.7 cw(c26.798,36.904) 26.594,36.904 26.594,37.65 cw(c26.798,37.65) 26.798,37.854 32.148,37.854 ccw(c32.148,38.395) 32.69,38.395 32.69,39.141 ccw(c32.148,39.141) 32.148,39.682 29.846,39.682 cw(c29.846,39.886) 29.642,39.886 29.642,40.538 cw(c30.464,40.538) 30.464,41.36 32.106,41.36 32.849,41.36 33.055,41.36 cw(c33.055,41.291) 33.124,41.291 33.124,40.768 ccw(c33.193,40.768) 33.193,40.699 33.33,40.699 ccw(c33.33,40.768) 33.399,40.768 33.399,41.291 cw(c33.468,41.291) 33.468,41.36 33.605,41.36 cw(c33.605,41.291) 33.674,41.291 33.674,40.768 ccw(c33.743,40.768) 33.743,40.699 33.88,40.699 ccw(c33.88,40.768) 33.949,40.768 33.949,41.291 cw(c34.018,41.291) 34.018,41.36 34.087,41.36 35.894,41.36 35.975,41.28 35.975,41.229 C188.1@36.056,41.148
CLKout4_N: T2.3 U9.24 | length 9
  Top Layer w0.112: T2.3@25.647,24.743 25.967,24.743 26.603,24.106 26.603,23.695 26.669,23.629 29.621,23.629 31.338,23.628 31.506,23.797 v1(31.572,23.797)
  Bottom Layer w0.112: v1(31.572,23.797) 31.741,23.628 33.513,23.628 33.607,23.722 U9.24@33.787,23.722
CLKout4_P: T2.1 U9.23 | length 9
  Top Layer w0.112: T2.1@25.647,22.203 25.967,22.203 26.603,22.839 26.603,23.25 26.669,23.316 29.492,23.316 31.338,23.316 31.506,23.147 v1(31.572,23.147)
  Bottom Layer w0.112: v1(31.572,23.147) 31.741,23.316 33.513,23.316 33.607,23.222 U9.23@33.787,23.222
CLKout5_N: R98.1 U9.27 | length 40.3
  Layer 3 w0.097: v1(15.697,47.899) cw(c15.697,47.762) 15.794,47.859 ccw(c16.123,48.188) 16.123,47.723 19.427,47.723 cw(c19.427,44.983) 22.167,44.983 22.167,27.635 ccw(c24.681,27.635) 24.681,25.121 30.975,25.121 31.39,25.121 31.566,25.297 v1(31.623,25.297)
  Bottom Layer w0.112: R98.1@14.184,48.082 cw(c14.184,47.961) 14.27,48.047 14.463,47.853 cw(c14.427,47.817) 14.478,47.817 ccw(c14.529,47.817) 14.493,47.781 ccw(c14.616,47.905) 14.616,47.73 15.343,47.73 ccw(c15.343,48.019) 15.547,47.815 15.585,47.853 cw(c15.697,47.74) v1(15.697,47.899) ; v1@31.689,25.297 31.858,25.128 33.513,25.128 33.607,25.222 U9.27@33.787,25.222
CLKout5_P: R97.1 U9.26 | length 40.4
  Layer 3 w0.097: v1(15.697,47.249) ccw(c15.697,47.387) 15.794,47.289 cw(c16.123,46.961) 16.123,47.426 19.427,47.426 cw(c19.427,44.983) 21.869,44.983 21.869,27.635 ccw(c24.681,27.635) 24.681,24.823 30.852,24.823 31.39,24.823 31.566,24.647 v1(31.623,24.647)
  Bottom Layer w0.112: R97.1@14.184,47.066 ccw(c14.184,47.187) 14.27,47.102 14.463,47.295 ccw(c14.427,47.331) 14.478,47.331 cw(c14.529,47.331) 14.493,47.367 cw(c14.616,47.244) 14.616,47.418 15.343,47.418 cw(c15.343,47.13) 15.547,47.334 15.585,47.296 ccw(c15.697,47.408) v1(15.697,47.249) ; v1(31.623,24.647) 31.689,24.647 31.858,24.816 33.513,24.816 33.607,24.722 U9.26@33.787,24.722
CMLout1_N: C15.1 U1.22 | length 66.1
  Bottom Layer w0.138: U1.22@47.363,44.292 47.499,44.292 cw(c47.499,44.153) 47.597,44.251 ccw(c47.695,44.349) 47.695,44.21 56.439,44.21 cw(c56.439,41.333) 59.316,41.333 59.316,22.743 ccw(c59.446,22.743) 59.446,22.613 59.872,22.613 cw(c59.872,22.146) 60.339,22.146 60.339,21.252 cw(c59.872,21.252) 59.872,20.785 58.546,20.785 ccw(c58.546,20.655) 58.416,20.655 58.416,19.761 ccw(c58.546,19.761) 58.546,19.631 59.872,19.631 cw(c59.872,19.164) 60.339,19.164 60.339,18.269 cw(c59.872,18.269) 59.872,17.802 58.424,17.802 ccw(c58.424,17.673) 58.294,17.673 58.294,16.778 ccw(c58.424,16.778) 58.424,16.649 58.849,16.649 cw(c58.849,16.182) 59.316,16.182 59.316,10.817 cw(c57.196,10.817) 58.695,9.318 56.98,7.602 ccw(c58.776,5.806) 56.236,5.806 56.236,5.08 56.236,4.997 ccw(c56.291,4.997) 56.291,4.942 56.434,4.942 cw(c56.434,4.887) 56.489,4.887 56.489,4.722 cw(c56.434,4.722) 56.434,4.667 56.291,4.667 ccw(c56.291,4.612) 56.236,4.612 56.236,2.159 56.236,-1.403 56.227,-1.412 56.227,-2.614 ccw(c56.364,-2.614) 56.267,-2.711 56.28,-2.725 ccw(c56.345,-2.66) 56.345,-2.752 cw(c56.345,-2.843) 56.41,-2.778 C15.1@56.464,-2.833
CMLout1_P: C16.1 U1.23 | length 66.1
  Bottom Layer w0.138: U1.23@47.363,43.792 47.499,43.792 ccw(c47.499,43.93) 47.597,43.832 cw(c47.695,43.734) 47.695,43.873 56.439,43.873 cw(c56.439,41.333) 58.979,41.333 58.979,39.116 58.979,39.076 cw(c58.924,39.076) 58.924,39.021 58.511,39.021 ccw(c58.511,38.966) 58.456,38.966 58.456,38.801 ccw(c58.511,38.801) 58.511,38.746 58.924,38.746 cw(c58.924,38.691) 58.979,38.691 58.979,38.608 58.979,22.743 ccw(c59.446,22.743) 59.446,22.276 59.872,22.276 cw(c59.872,22.146) 60.001,22.146 60.001,21.252 cw(c59.872,21.252) 59.872,21.122 58.546,21.122 ccw(c58.546,20.655) 58.079,20.655 58.079,19.761 ccw(c58.546,19.761) 58.546,19.294 59.872,19.294 cw(c59.872,19.164) 60.001,19.164 60.001,18.269 cw(c59.872,18.269) 59.872,18.14 58.424,18.14 ccw(c58.424,17.673) 57.957,17.673 57.957,16.778 ccw(c58.424,16.778) 58.424,16.311 58.849,16.311 cw(c58.849,16.182) 58.979,16.182 58.979,10.82 cw(c57.188,10.82) 58.454,9.554 56.739,7.839 ccw(c58.77,5.808) 55.898,5.808 55.898,-1.263 55.889,-1.272 55.889,-2.614 cw(c55.751,-2.614) 55.849,-2.711 55.835,-2.725 ; C16.1@55.651,-2.833 55.706,-2.778 cw(c55.771,-2.843) 55.771,-2.752 ccw(c55.771,-2.66) 55.835,-2.725
CMLout2_N: C17.1 U1.24 | length 66
  Bottom Layer w0.138: U1.24@47.363,43.292 47.499,43.292 cw(c47.499,43.153) 47.597,43.251 ccw(c47.695,43.349) 47.695,43.21 55.679,43.21 cw(c55.679,41.732) 57.157,41.732 57.157,36.651 cw(c57.055,36.043) 57.672,36.043 57.672,35.447 cw(c57.055,35.447) 57.055,34.831 56.922,34.831 ccw(c56.922,34.552) 56.643,34.552 56.643,33.956 ccw(c56.922,33.956) 56.922,33.677 57.055,33.677 cw(c57.055,33.061) 57.672,33.061 57.672,32.465 cw(c57.055,32.465) 57.055,31.849 56.922,31.849 ccw(c56.922,31.57) 56.643,31.57 56.643,30.974 ccw(c56.922,30.974) 56.922,30.695 57.055,30.695 cw(c57.055,30.079) 57.672,30.079 57.672,29.483 cw(c57.055,29.483) 57.055,28.866 56.922,28.866 ccw(c56.922,28.588) 56.643,28.588 56.643,27.991 ccw(c56.922,27.991) 56.922,27.713 cw(c56.922,27.477) 57.157,27.477 57.157,26.035 ; C17.1@52.476,-2.839 52.422,-2.784 ccw(c52.357,-2.849) 52.357,-2.758 cw(c52.357,-2.666) 52.293,-2.731 52.279,-2.717 cw(c52.376,-2.62) 52.239,-2.62 52.239,-1.301 52.248,-1.292 52.248,-0.049 cw(c52.428,-0.049) 52.428,0.131 52.498,0.131 ccw(c52.498,0.649) 53.016,0.649 53.016,1.696 ccw(c52.498,1.696) 52.498,2.214 51.89,2.214 cw(c51.89,2.394) 51.71,2.394 51.71,3.441 cw(c51.89,3.441) 51.89,3.621 52.498,3.621 ccw(c52.498,4.139) 53.016,4.139 53.016,5.186 ccw(c52.498,5.186) 52.498,5.704 52.428,5.704 cw(c52.428,5.884) 52.248,5.884 52.248,6.644 cw(c54.788,6.644) 52.992,8.44 53.954,9.402 ccw(c51.923,11.433) 54.795,11.433 54.795,12.749 ccw(c54.768,13.289) 55.309,13.289 55.309,14.035 ccw(c54.768,14.035) 54.768,14.577 54.485,14.577 cw(c54.485,14.781) 54.281,14.781 54.281,15.526 cw(c54.485,15.526) 54.485,15.73 54.768,15.73 ccw(c54.768,16.272) 55.309,16.272 55.309,17.017 ccw(c54.768,17.017) 54.795,17.558 54.795,20.168 54.795,21.325 cw(c54.85,21.325) 54.85,21.381 54.968,21.381 ccw(c54.968,21.436) 55.023,21.436 55.023,21.601 ccw(c54.968,21.601) 54.968,21.656 54.85,21.656 cw(c54.85,21.711) 54.795,21.711 54.795,21.793 54.795,21.971 cw(c56.407,21.971) 55.267,23.111 56.453,24.297 ccw(c54.753,25.997) 57.157,25.997